# Altium PCB sheet4.PcbDoc (part 2 of 3)
Units mm, origin at the board's own origin, x right, y up, seen from the top; angles counter-clockwise.
Board outline 48.25 x 36 mm, 2 copper layers (Top Layer, Bottom Layer); 112 components, 103 nets, 475 pads, 0 vias.
Unrouted connection lines stored in the file: 312.
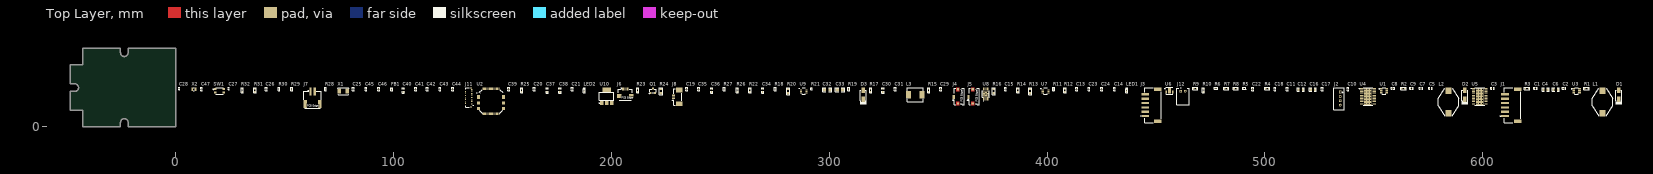
[diagram p0: Top Layer view]

## Part data (continued)
J12: "Conn Shrouded Header (4 Sides) HDR 2 POS 2mm Solder RA Side Entry Thru-Hole Box", Color=Natural,White, Contact Resistance=20mR, Current Rating=2A, Flammability Rating="UL94 V-0", Housing Color=White, Insulation Resistance=1GR, LCSC Part Number=C173752, Manufacturer=JST, Max Operating Temperature=85°C, Max Voltage Rating (AC)=100V, Min Operating Temperature=-25°C, Supplier Part Number 1=8201494P, Category="Headers and Wire Housings", ComponentLink1Description=https://datasheet.ciiva.com/11747/0900766b8082f558-11747128.pdf?src-supplier=Rs, ComponentLink1URL=https://datasheet.ciiva.com/11747/0900766b8082f558-11747128.pdf?src-supplier=Rs, ComponentLink2Description=https://datasheet.ciiva.com/712/eph-712447.pdf?src-supplier=Digi-Key, ComponentLink2URL=https://datasheet.ciiva.com/712/eph-712447.pdf?src-supplier=Digi-Key, ComponentLink3Description=https://datasheet.ciiva.com/16484/s2b-ph-k-slfsn-16484405.pdf?src-supplier=Future+Electronics, ComponentLink3URL=https://datasheet.ciiva.com/16484/s2b-ph-k-slfsn-16484405.pdf?src-supplier=Future+Electronics, ComponentLink4Description=https://datasheet.ciiva.com/26894/getdatasheetpartid-641020-26894599.pdf?src-supplier=Verical, ComponentLink4URL=https://datasheet.ciiva.com/26894/getdatasheetpartid-641020-26894599.pdf?src-supplier=Verical, ComponentLink5Description=https://datasheet.ciiva.com/8052/80564-8052207.pdf?src-supplier=Element14, ComponentLink5URL=https://datasheet.ciiva.com/8052/80564-8052207.pdf?src-supplier=Element14, Contact Material=Brass,Tin,Bronze, Contact Mating Length=0.13inch, Contact Plating=Tin,Copper, Contact Type="Male Pin", Depth=7.6mm, Fastening Type=Detent, Gender=Male, Height=9.4mm, Housing Material=Polyamide, Item Type="JST Connector", Lead Free="Lead Free", Lead Pitch=2mm, Length=5.9mm, Manufacturer Part Number=S2B-PH-K-S(LF)(SN), Max Current Rating=2A, Max Voltage Rating (DC)=100V, Mounting Technology="Through Hole", Number Of Contacts=2, Number of Poles=2, Number of Positions=2, Number of Rows=1, Orientation="Right Angle", Packaging=Bulk, Pins=2, Pitch=2mm, Pricing 1="125=0.02920, 250=0.13800, 1250=0.12800, 5000=0.12200 (GBP)", Reach SVHC Compliant=No, RoHS=Yes, Series=PH, Stock 1=39975, Supplier 1=Rs, Termination=Solder, Voltage Rating=100V, Voltage Rating (AC)=100V, Width=4.5mm, Working Voltage=100V
L1 L2: library part SSL0804T-220M-N, "2.6A 22uH ±20% 0.085Ω 2.6A SMD,12.95x9.4x5.21mm Power Inductors ROHS", LCSC Part Number=C108312, Manufacturer="Chilisin Elec", Package=SMD,12.95x9.4x5.21mm, ComponentLink1Description=LCSC, ComponentLink1URL=https://www.lcsc.com/product-detail/Power-Inductors_Chilisin-Elec-SSL0804T-220M-N_C108312.html, Item Type=Inductor, Manufacturer Part Number=SSL0804T-220M-N
L3: library part 0630CDMCCDS-6R8MC, "FIXED IND 6.8UH 5A 48 MOHM SMD", Case/Package=Nonstandard, Current Rating=5A, DC Resistance (DCR)=48mR, LCSC Part Number=C167295, Manufacturer=Sumida, Max Operating Temperature=125°C, Min Operating Temperature=-55°C, Saturation Current=6.3A, Supplier Part Number 1=308-2467-1-ND, Test Frequency=100kHz, Tolerance=20%, ComponentLink1Description=http://products.sumida.com/products/pdf/0630CDMCDDS.pdf?src-supplier=Digi-Key, ComponentLink1URL=http://products.sumida.com/products/pdf/0630CDMCDDS.pdf?src-supplier=Digi-Key, Core Material=Metal, Height - Seated (Max)=0.118inch, Inductance=6.8uH, Item Type=Inductor, Length=0.276inch, Manufacturer Part Number=0630CDMCCDS-6R8MC, Mount="Surface Mount", Packaging="Tape and Reel", Pricing 1="1=0.97, 10=0.845, 25=0.7848, 50=0.6642, 100=0.6038, 250=0.56752, 500=0.50716 (USD)", RoHS Compliant=Yes, Shielding=Shielded, Stock 1=1582, Supplier 1=Digi-Key, Width=0.26inch
LED1: library part 16-213/GHC-YR1S1/3T, "Green 520~535nm 0402 Light Emitting Diodes (LED) RoHS", LCSC Part Number=C74338, Manufacturer="Everlight Elec", Package=0402, ComponentLink1Description=LCSC, ComponentLink1URL=https://www.lcsc.com/product-detail/Light-Emitting-Diodes-LED_Everlight-Elec-16-213-GHC-YR1S1-3T_C74338.html, Dominant Wavelength / Coordinate rank=520~535nm, Illumination Color=Green, Item Type=LED, Luminous Intensity (IF=20mA)=112~285mcd, Manufacturer Part Number=16-213/GHC-YR1S1/3T, Mounting Type="Surface Mount"
LED2: library part XZMDK68W-2, "LED RED CLEAR CHIP SMD", Case Code (Imperial)=0402, Case Code (Metric)=1005, Forward Voltage=1.95V, Lens Color=Colorless, Manufacturer=SunLED, Supplier Part Number 1=1497-1174-6-ND, Test Current=20mA, Case/Package=0402, Color=Red, ComponentLink1Description=http://www.sunledusa.com/products/spec/XZMDK68W-2.pdf?src-supplier=Digi-Key, ComponentLink1URL=http://www.sunledusa.com/products/spec/XZMDK68W-2.pdf?src-supplier=Digi-Key, ComponentLink2Description=https://www.sunledusa.com/products/spec/XZMDK68W-2.pdf?src-supplier=Digi-Key, ComponentLink2URL=https://www.sunledusa.com/products/spec/XZMDK68W-2.pdf?src-supplier=Digi-Key, Dominant Wavelength=630nm, Height=0.6mm, Item Type=LED, Length=1mm, Lens Transparency=Clear, Luminous Intensity=69mcd, Manufacturer Part Number=XZMDK68W-2, Mount="Surface Mount", Packaging="Tape and Reel", Pricing 1="1=0.43, 10=0.306, 100=0.136, 500=0.0952, 1000=0.0782 (USD)", Stock 1=69539, Supplier 1=Digi-Key, Viewing Angle=120°, Width=0.5mm
Q1: "TRANS NPN 40V 2A SOT23-3", Case/Package=SOT-23-3, Clock Frequency=100MHz, Collector Base Voltage (VCBO)=40V, Collector Emitter Saturation Voltage=115mV, Emitter Base Voltage (VEBO)=6V, Frequency=150MHz, LCSC Part Number=C145175, Manufacturer="ON Semiconductor", Max Collector Current=2A, Max Operating Temperature=150°C, Max Power Dissipation=540mW, Min Operating Temperature=-55°C, Package Quantity=3000, Supplier Part Number 1=6030674, Category=BJTs, Collector Emitter Breakdown Voltage=40V, Collector Emitter Voltage (VCEO)=40V, Collector-emitter Voltage-Max=115mV, ComponentLink1Description=https://datasheet.ciiva.com/976/nss40201l-d-976800.pdf?src-supplier=Digi-Key, ComponentLink1URL=https://datasheet.ciiva.com/976/nss40201l-d-976800.pdf?src-supplier=Digi-Key, ComponentLink2Description=https://datasheet.ciiva.com/11204/nss40201l-d-11204882.pdf?src-supplier=Avnet, ComponentLink2URL=https://datasheet.ciiva.com/11204/nss40201l-d-11204882.pdf?src-supplier=Avnet, ComponentLink3Description=https://datasheet.ciiva.com/16291/nss40201l-d-115376-16291797.pdf?src-supplier=Mouser, ComponentLink3URL=https://datasheet.ciiva.com/16291/nss40201l-d-115376-16291797.pdf?src-supplier=Mouser, ComponentLink4Description=https://datasheet.ciiva.com/30480/0900766b8121b5a5-30480502.pdf?src-supplier=Rs, ComponentLink4URL=https://datasheet.ciiva.com/30480/0900766b8121b5a5-30480502.pdf?src-supplier=Rs, ComponentLink5Description=https://datasheet.ciiva.com/976/nss40201l-d-976801.pdf?src-supplier=Digi-Key, ComponentLink5URL=https://datasheet.ciiva.com/976/nss40201l-d-976801.pdf?src-supplier=Digi-Key, ComponentLink6Description=https://datasheet.ciiva.com/976/nss40201l-d-976802.pdf?src-supplier=Digi-Key, ComponentLink6URL=https://datasheet.ciiva.com/976/nss40201l-d-976802.pdf?src-supplier=Digi-Key, ComponentLink7Description=https://datasheet.ciiva.com/22641/nss40201l-d-22641179.pdf?src-supplier=Farnell, ComponentLink7URL=https://datasheet.ciiva.com/22641/nss40201l-d-22641179.pdf?src-supplier=Farnell, ComponentLink8Description=https://datasheet.ciiva.com/16222/nss40201l-d-16222093.pdf?src-supplier=Future+Electronics, ComponentLink8URL=https://datasheet.ciiva.com/16222/nss40201l-d-16222093.pdf?src-supplier=Future+Electronics, Element Configuration=Single, Gain Bandwidth Product=150MHz, Halogen Free="Halogen Free", Height=1.11mm, hFE Min=200, Item Type=Transistor, Lead Free="Lead Free", Length=3.04mm, Manufacturer Part Number=NSS40201LT1G, Max Breakdown Voltage=40V, Number of Elements=1, Packaging="Tape and Reel", Pins=3, Polarity=NPN, Power Dissipation=540mW, Pricing 1="1=0.42000, 15=0.34000, 75=0.29500, 300=0.25500, 1500=0.21000 (USD)", Radiation Hardening=No, Reach SVHC Compliant=Yes, RoHS=Yes, RoHS Compliant=Yes, Series=-, Stock 1=155, Supplier 1="Future Electronics", Transition Frequency=150MHz, Width=2.64mm
R1 R2: library part RC0603JR-07100KL, "RES 100K OHM 5% 1/10W 0603", Case Code (Imperial)=0603, Case Code (Metric)=1608, LCSC Part Number=C100048, Manufacturer=Yageo, Max Operating Temperature=155°C, Max Power Dissipation=100mW, Min Operating Temperature=-55°C, Resistance=100kR, Resistance Tolerance=5%, Resistor Type="Thick Film", Supplier Part Number 1=311-100KGRCT-ND, Temperature Coefficient=100ppm/°C, Voltage Rating=50V, Case/Package=0603, Category="Chip SMD Resistors", ComponentLink1Description=https://datasheet.ciiva.com/7746/443971-7746424.pdf?src-supplier=Element14, ComponentLink1URL=https://datasheet.ciiva.com/7746/443971-7746424.pdf?src-supplier=Element14, ComponentLink2Description=https://datasheet.ciiva.com/7983/443971-7983686.pdf?src-supplier=Element14, ComponentLink2URL=https://datasheet.ciiva.com/7983/443971-7983686.pdf?src-supplier=Element14, ComponentLink3Description=https://datasheet.ciiva.com/7746/443971-7746423.pdf?src-supplier=Element14, ComponentLink3URL=https://datasheet.ciiva.com/7746/443971-7746423.pdf?src-supplier=Element14, ComponentLink4Description=https://datasheet.ciiva.com/8887/pyu-rc0603-51-rohs-l-4-8887903.pdf?src-supplier=Avnet, ComponentLink4URL=https://datasheet.ciiva.com/8887/pyu-rc0603-51-rohs-l-4-8887903.pdf?src-supplier=Avnet, Contact Plating=Tin,Matte, Features="Moisture Resistant", Item Type=Resistor, Lead Free="Lead Free", Manufacturer Part Number=RC0603JR-07100KL, Number of Pins=2, Number of Terminations=2, Packaging="Tape and Reel", Power Rating=100mW, Pricing 1="1=0.10000, 10=0.02000, 100=0.00800, 1000=0.00360, 2500=0.00312 (USD)", Radiation Hardening=No, REACH SVHC="No SVHC", RoHS=Yes, RoHS Compliant=Yes, Series=RC, Size Code=0603, Stock 1=1210037, Supplier 1=Digi-Key, Termination=SMD/SMT, Tolerance=5%, Voltage Rating (DC)=50V, Width=0.8mm
R3 R4: library part RC0603FR-075K1L, "RES 5.1K OHM 1% 1/10W 0603", Case Code (Imperial)=0603, Case Code (Metric)=1608, LCSC Part Number=C105580, Manufacturer=Yageo, Max Operating Temperature=155°C, Max Power Dissipation=100mW, Min Operating Temperature=-55°C, Package Quantity=1, Resistance=5.1kR, Resistance Tolerance=1%, Resistor Type="Thick Film", Temperature Coefficient=100ppm/°C, Voltage Rating=50V, Case/Package=0603, Category="Chip SMD Resistors", ComponentLink1Description=https://datasheet.ciiva.com/46395/443971-46395016.pdf?src-supplier=Element14, ComponentLink1URL=https://datasheet.ciiva.com/46395/443971-46395016.pdf?src-supplier=Element14, ComponentLink2Description=https://datasheet.ciiva.com/2454/pyu-r-int-thick-7-2454046.pdf?src-supplier=Digi-Key, ComponentLink2URL=https://datasheet.ciiva.com/2454/pyu-r-int-thick-7-2454046.pdf?src-supplier=Digi-Key, ComponentLink3Description=https://datasheet.ciiva.com/2454/pyu-r-int-thick-7-2454047.pdf?src-supplier=Digi-Key, ComponentLink3URL=https://datasheet.ciiva.com/2454/pyu-r-int-thick-7-2454047.pdf?src-supplier=Digi-Key, ComponentLink4Description=https://datasheet.ciiva.com/2454/pyu-r-int-thick-7-2454045.pdf?src-supplier=Digi-Key, ComponentLink4URL=https://datasheet.ciiva.com/2454/pyu-r-int-thick-7-2454045.pdf?src-supplier=Digi-Key, ComponentLink5Description=https://datasheet.ciiva.com/15189/getdatasheetpartid-326732-15189786.pdf?src-supplier=Verical, ComponentLink5URL=https://datasheet.ciiva.com/15189/getdatasheetpartid-326732-15189786.pdf?src-supplier=Verical, Construction=Rectangular, Depth=0.8mm, Features="Moisture Resistant", Height=0.022inch, Item Type=Resistor, Lead Free="Lead Free", Length=0.063inch, Manufacturer Part Number=RC0603FR-075K1L, Military Standard=Not, Number of Pins=2, Number of Terminations=2, Packaging="Tape and Reel", Power Rating=100mW, Pricing 1="5000=0.00133, 10000=0.00131, 20000=0.00127 (USD)", Reach SVHC Compliant=Yes, RoHS=Yes, RoHS Compliant=Yes, Series=RC, Size Code=0603, Stock 1=100000, Supplier 1=Avnet, Supplier Part Number 1=RC0603FR-075K1L, Termination=SMD/SMT, Tolerance=1%, Voltage Rating (DC)=50V, Width=0.031inch
R5 R6 R27 R29 R30: library part RC0402FR-0710KL, "RES 10K OHM 1% 1/16W 0402", Case Code (Imperial)=0402, Case Code (Metric)=1005, LCSC Part Number=C60490, Manufacturer=Yageo, Max Operating Temperature=155°C, Max Power Dissipation=63mW, Min Operating Temperature=-55°C, Power Rating=62.5mW, Resistance=10kR, Resistance Tolerance=1%, Resistor Type="Thick Film", Supplier Part Number 1=603-RC0402FR-0710KL, Temperature Coefficient=100ppm/°C, Voltage Rating=50V, Case/Package=0402, Category="Chip SMD Resistors", ComponentLink1Description=https://datasheet.ciiva.com/7660/38568-7660787.pdf?src-supplier=Element14, ComponentLink1URL=https://datasheet.ciiva.com/7660/38568-7660787.pdf?src-supplier=Element14, ComponentLink2Description=https://datasheet.ciiva.com/7849/1686128-7849814.pdf?src-supplier=Element14, ComponentLink2URL=https://datasheet.ciiva.com/7849/1686128-7849814.pdf?src-supplier=Element14, ComponentLink3Description=https://datasheet.ciiva.com/7983/1018594-7983486.pdf?src-supplier=Element14, ComponentLink3URL=https://datasheet.ciiva.com/7983/1018594-7983486.pdf?src-supplier=Element14, ComponentLink4Description=https://datasheet.ciiva.com/22747/1018594-22747512.pdf?src-supplier=Element14, ComponentLink4URL=https://datasheet.ciiva.com/22747/1018594-22747512.pdf?src-supplier=Element14, ComponentLink5Description=https://datasheet.ciiva.com/12667/pyu-rc0402-51-rohs-l-6-r-12667067.pdf?src-supplier=Mouser, ComponentLink5URL=https://datasheet.ciiva.com/12667/pyu-rc0402-51-rohs-l-6-r-12667067.pdf?src-supplier=Mouser, ComponentLink6Description=https://datasheet.ciiva.com/7849/1784430-7849813.pdf?src-supplier=Element14, ComponentLink6URL=https://datasheet.ciiva.com/7849/1784430-7849813.pdf?src-supplier=Element14, ComponentLink7Description=https://datasheet.ciiva.com/7849/1784430-7849815.pdf?src-supplier=Element14, ComponentLink7URL=https://datasheet.ciiva.com/7849/1784430-7849815.pdf?src-supplier=Element14, Construction=Rectangular, Depth=0.5mm, Features="Moisture Resistant", Height=0.32mm, Lead Free="Lead Free", Lead Pitch=0.2mm, Length=1mm, Manufacturer Part Number=RC0402FR-0710KL, Military Standard=Not, Number of Pins=2, Number of Terminations=2, Packaging="Tape and Reel", Pricing 1="1=0.10000, 10=0.01400, 50=0.01400, 100=0.00500, 1000=0.00300, 10000=0.00200 (USD)", REACH SVHC="No SVHC", RoHS=Yes, RoHS Compliant=Yes, Series=RC, Stock 1=18648329, Supplier 1=Mouser, Termination=SMD/SMT, Tolerance=1%, Voltage Rating (DC)=50V, Width=0.5mm, Working Voltage=50V
R7 R8 R9 R10: library part ERJ-3EKF1501V, "RES SMD 1.5K OHM 1% 1/10W 0603", Case Code (Imperial)=0603, Case Code (Metric)=1608, Manufacturer=Panasonic, Max Operating Temperature=155°C, Max Power Dissipation=100mW, Min Operating Temperature=-55°C, Package Quantity=1, Resistance Tolerance=1%, Resistor Type="Thick Film", Supplier Part Number 1=1755744, Temperature Coefficient=100ppm/°C, Voltage Rating=75V, Case/Package=0603, Category="Chip SMD Resistors", ComponentLink1Description=https://datasheet.ciiva.com/34303/1987644-34303574.pdf?src-supplier=Jameco, ComponentLink1URL=https://datasheet.ciiva.com/34303/1987644-34303574.pdf?src-supplier=Jameco, ComponentLink2Description=https://datasheet.ciiva.com/7830/aoa0000ce2-7830731.pdf?src-supplier=Element14, ComponentLink2URL=https://datasheet.ciiva.com/7830/aoa0000ce2-7830731.pdf?src-supplier=Element14, ComponentLink3Description=https://datasheet.ciiva.com/7830/426256-7830981.pdf?src-supplier=Element14, ComponentLink3URL=https://datasheet.ciiva.com/7830/426256-7830981.pdf?src-supplier=Element14, ComponentLink4Description=https://datasheet.ciiva.com/28514/1678782-28514202.pdf?src-supplier=Element14, ComponentLink4URL=https://datasheet.ciiva.com/28514/1678782-28514202.pdf?src-supplier=Element14, ComponentLink5Description=https://datasheet.ciiva.com/24124/aoa0000ce2-24124271.pdf?src-supplier=Mouser, ComponentLink5URL=https://datasheet.ciiva.com/24124/aoa0000ce2-24124271.pdf?src-supplier=Mouser, ComponentLink6Description=https://datasheet.ciiva.com/16767/70260748-16767326.pdf?src-supplier=Allied+Electronics, ComponentLink6URL=https://datasheet.ciiva.com/16767/70260748-16767326.pdf?src-supplier=Allied+Electronics, ComponentLink7Description=https://datasheet.ciiva.com/16759/70260748-16759967.pdf?src-supplier=Allied+Electronics, ComponentLink7URL=https://datasheet.ciiva.com/16759/70260748-16759967.pdf?src-supplier=Allied+Electronics, ComponentLink8Description=https://datasheet.ciiva.com/9198/aoa0000ce2-9198086.pdf?src-supplier=Avnet, ComponentLink8URL=https://datasheet.ciiva.com/9198/aoa0000ce2-9198086.pdf?src-supplier=Avnet, ComponentLink9Description=https://datasheet.ciiva.com/16449/aoa0000ce2-16449406.pdf?src-supplier=Future+Electronics, ComponentLink9URL=https://datasheet.ciiva.com/16449/aoa0000ce2-16449406.pdf?src-supplier=Future+Electronics, ComponentLink10Description=https://datasheet.ciiva.com/48530/aoa0000ce2-48530982.pdf?src-supplier=Avnet, ComponentLink10URL=https://datasheet.ciiva.com/48530/aoa0000ce2-48530982.pdf?src-supplier=Avnet, Construction=Rectangular, Contact Plating=Tin, Depth=0.8mm, Features="Automotive AEC-Q200", Height=0.45mm, Item Type=Resistor, Lead Free="Lead Free", Length=1.6mm, Manufacturer Part Number=ERJ-3EKF1501V, Military Standard=Not, Mounting Technology="Surface Mount", Number of Terminations=2, Packaging="Tape and Reel", Pins=2, Power Rating=100mW, Pricing 1="5000=0.00000 (GBP)", Radiation Hardening=No, Reach SVHC Compliant=Yes, RoHS=Yes, RoHS Compliant=Yes, Series=ERJ, Stock 1=176974, Supplier 1=Rs, Technology="THICK FILM", Termination=SMD/SMT, Tolerance=1%, Voltage Rating (DC)=75V, Weight=7.1E-05oz, Width=0.8mm
R11: library part CRCW04021K00FKEDHP, "RES SMD 1K OHM 1% 1/5W 0402", Case Code (Imperial)=0402, Case Code (Metric)=1005, LCSC Part Number=C313354, Manufacturer="Vishay Dale", Max Operating Temperature=155°C, Max Power Dissipation=125mW, Min Operating Temperature=-55°C, Package Quantity=10, Resistance=1kR, Resistance Tolerance=1%, Resistor Type="Thick Film", Supplier Part Number 1=541-1.00KYCT-ND, Temperature Coefficient=100ppm/°C, Voltage Rating=50V, Case/Package=0402, ComponentLink1Description=http://www.farnell.com/datasheets/2339608.pdf?src-supplier=Element14, ComponentLink1URL=http://www.farnell.com/datasheets/2339608.pdf?src-supplier=Element14, ComponentLink2Description=http://www.vishay.com/docs/20043/crcwhpe3.pdf?src-supplier=Digi-Key, ComponentLink2URL=http://www.vishay.com/docs/20043/crcwhpe3.pdf?src-supplier=Digi-Key, ComponentLink3Description=http://www.mouser.com/ds/2/427/crcwhpe3-46056.pdf?src-supplier=Mouser, ComponentLink3URL=http://www.mouser.com/ds/2/427/crcwhpe3-46056.pdf?src-supplier=Mouser, ComponentLink4Description=http://www.vishay.com/docs/20043/crcwhpe3.pdf?src-supplier=Avnet, ComponentLink4URL=http://www.vishay.com/docs/20043/crcwhpe3.pdf?src-supplier=Avnet, ComponentLink5Description=http://www.vishay.com/docs/20043/crcwhpe3.pdf?src-supplier=Future+Electronics, ComponentLink5URL=http://www.vishay.com/docs/20043/crcwhpe3.pdf?src-supplier=Future+Electronics, Construction=Rectangular, Contact Plating=Tin, Depth=0.5mm, Features="Automotive AEC-Q200", Height=0.3mm, Lead Free="Lead Free", Length=1mm, Manufacturer Part Number=CRCW04021K00FKEDHP, Military Standard=Not, Mount="Surface Mount", Number of Pins=2, Number of Terminations=2, Packaging="Tape and Reel", Power Rating=125mW, Pricing 1="1=0.15, 10=0.132, 100=0.0506, 1000=0.02226, 2500=0.01923, 5000=0.0172 (USD)", Radiation Hardening=No, REACH SVHC=Unknown, RoHS Compliant=Yes, Series=CRCW-HP, Size Code=0402, Stock 1=315989, Supplier 1=Digi-Key, Technology="THICK FILM", Termination=SMD/SMT, Tolerance=1%, Voltage Rating (DC)=50V, Weight=2.3E-05oz, Width=0.5mm
R12: library part CRCW06036K20JNEA, "RES SMD 6.2K OHM 5% 1/10W 0603", Case Code (Imperial)=0603, Case Code (Metric)=1608, LCSC Part Number=C2079587, Manufacturer="Vishay Dale", Max Operating Temperature=155°C, Max Power Dissipation=100mW, Min Operating Temperature=-55°C, Package Quantity=1, Resistor Type="Thick Film", Temperature Coefficient=200ppm/°C, Tolerance=5%, Voltage Rating=75V, Case/Package=0603, Category="Chip SMD Resistors", ComponentLink1Description=https://datasheet.ciiva.com/3257/dcrcwe3-3257845.pdf?src-supplier=Avnet, ComponentLink1URL=https://datasheet.ciiva.com/3257/dcrcwe3-3257845.pdf?src-supplier=Avnet, ComponentLink2Description=https://datasheet.ciiva.com/2462/dcrcwe3-2462295.pdf?src-supplier=Digi-Key, ComponentLink2URL=https://datasheet.ciiva.com/2462/dcrcwe3-2462295.pdf?src-supplier=Digi-Key, ComponentLink3Description=https://datasheet.ciiva.com/2462/dcrcwe3-2462296.pdf?src-supplier=Digi-Key, ComponentLink3URL=https://datasheet.ciiva.com/2462/dcrcwe3-2462296.pdf?src-supplier=Digi-Key, ComponentLink4Description=https://datasheet.ciiva.com/2462/dcrcwe3-2462297.pdf?src-supplier=Digi-Key, ComponentLink4URL=https://datasheet.ciiva.com/2462/dcrcwe3-2462297.pdf?src-supplier=Digi-Key, ComponentLink5Description=https://datasheet.ciiva.com/5549/dcrcwe3-109170-5549114.pdf?src-supplier=Mouser, ComponentLink5URL=https://datasheet.ciiva.com/5549/dcrcwe3-109170-5549114.pdf?src-supplier=Mouser, Construction=Rectangular, Contact Plating=Tin, Depth=0.85mm, Features="Automotive AEC-Q200", Height=0.02inch, Item Type=Resistor, Lead Free="Lead Free", Length=1.55mm, Manufacturer Part Number=CRCW06036K20JNEA, Military Standard=Not, Number of Terminations=2, Packaging="Tape and Reel", Power Rating=100mW, Pricing 1="1=0.06100, 10=0.02470, 25=0.02440, 50=0.02420, 100=0.01220, 250=0.01170, 500=0.01070, 1000=0.00550 (USD)", Radiation Hardening=No, RoHS=Yes, RoHS Compliant=Yes, Series=CRCW, Stock 1=2763, Supplier 1="Arrow Electronics", Supplier Part Number 1=CRCW06036K20JNEA, Termination=SMD/SMT, Voltage Rating (DC)=75V, Weight=7.1E-05oz, Width=0.033inch
R13 R16 R20 R24: library part TNPW080510R0FEEA, "RES 10 OHM 1% 1/8W 0805", Case Code (Imperial)=0805, Case Code (Metric)=2012, LCSC Part Number=C844061, Manufacturer=Vishay, Max Operating Temperature=125°C, Min Operating Temperature=-55°C, Power Rating=125mW, Resistor Type="Thin Film", Supplier Part Number 1=71-TNPW080510R0FEEA, Temperature Coefficient=25ppm/°C, Tolerance=1%, Voltage Rating=150V, Case/Package=0805, Category="Chip SMD Resistors", ComponentLink1Description=https://datasheet.ciiva.com/16787/70201627-16787918.pdf?src-supplier=Allied+Electronics, ComponentLink1URL=https://datasheet.ciiva.com/16787/70201627-16787918.pdf?src-supplier=Allied+Electronics, Contact Plating=Tin, Depth=1.25mm, Height=0.45mm, Item Type=Resistor, Lead Free="Lead Free", Length=2mm, Manufacturer Part Number=TNPW080510R0FEEA, Mounting Technology="Surface Mount", Packaging="Tape and Reel", Pricing 1="1=0.57000, 10=0.43800, 50=0.43800, 100=0.18500, 500=0.13400, 1000=0.10200, 2500=0.09600, 5000=0.08500, 10000=0.08500 (USD)", Radiation Hardening=No, RoHS=Yes, RoHS Compliant=Yes, Series="TNPW e3", Stock 1=22670, Supplier 1=Mouser, Technology="THIN FILM", Termination=SMD/SMT, Weight=0.000194oz, Width=1.2mm
R14 R22: library part RL0603FR-070R1L, "RES 0.1 OHM 1% 1/10W 0603", Case Code (Imperial)=0603, Case Code (Metric)=1608, LCSC Part Number=C326946, Manufacturer=Yageo, Max Operating Temperature=125°C, Max Power Dissipation=100mW, Min Operating Temperature=-55°C, Package Quantity=1, Resistance Tolerance=1%, Resistor Type="Thick Film", Supplier Part Number 1=1378876, Temperature Coefficient=800ppm/°C, Voltage Rating=50V, Case/Package=0603, Category="Chip SMD Resistors", ComponentLink1Description=https://datasheet.ciiva.com/15328/pyu-rl-521-rohs-l-5-15328748.pdf?src-supplier=Mouser, ComponentLink1URL=https://datasheet.ciiva.com/15328/pyu-rl-521-rohs-l-5-15328748.pdf?src-supplier=Mouser, ComponentLink2Description=https://datasheet.ciiva.com/7746/877049-7746575.pdf?src-supplier=Element14, ComponentLink2URL=https://datasheet.ciiva.com/7746/877049-7746575.pdf?src-supplier=Element14, Construction=Rectangular, Contact Plating=Tin,Matte, Depth=0.8mm, Features="Moisture Resistant", Height=0.022inch, Item Type=Resistor, Lead Free="Lead Free", Lead Pitch=0.25mm, Length=0.063inch, Manufacturer Part Number=RL0603FR-070R1L, Military Standard=Not, Number of Terminations=2, Packaging="Tape and Reel", Pins=2, Power Rating=100mW, Pricing 1="5000=0.02140, 15000=0.02080, 20000=0.02050, 50000=0.02000, 75000=0.01970, 100000=0.01960, 150000=0.01930, 200000=0.01880, 375000=0.01840 (USD)", Radiation Hardening=No, RoHS=Yes, RoHS Compliant=Yes, Series=RL, Stock 1=530000, Supplier 1="Future Electronics", Technology="THICK FILM", Termination=SMD/SMT, Tolerance=1%, Voltage Rating (DC)=50V, Weight=7.1E-05oz, Width=0.8mm
R15: library part RC0603FR-07200KL, "RES SMD 200K OHM 1% 1/10W 0603", LCSC Part Number=C105574, Manufacturer=Yageo, Package=0603, ComponentLink3Description=LCSC, ComponentLink3URL=https://www.lcsc.com/product-detail/Chip-Resistor-Surface-Mount_YAGEO-RC0603FR-07200KL_C105574.html, Item Type=Resistor, Manufacturer Part Number=RC0603FR-07200KL
R17: library part RT0603BRD0768KL, "RES SMD 68K OHM 0.1% 1/10W 0603", Case Code (Imperial)=0603, Case Code (Metric)=1608, Manufacturer=Yageo, Max Operating Temperature=125°C, Min Operating Temperature=-55°C, Power Rating=100mW, Resistance=68kR, Resistor Type="Thin Film", Supplier Part Number 1=YAG4586CT-ND, Temperature Coefficient=25ppm/°C, Tolerance=0.1%, Voltage Rating=75V, Voltage Rating (DC)=50V, Case/Package=0603, Category="Chip SMD Resistors", ComponentLink1Description=https://datasheet.ciiva.com/12694/pyu-rt-1-to-0-05-rohs-l-4-12694907.pdf?src-supplier=Mouser, ComponentLink1URL=https://datasheet.ciiva.com/12694/pyu-rt-1-to-0-05-rohs-l-4-12694907.pdf?src-supplier=Mouser, Construction=Rectangular, Contact Plating=Tin,Matte, Depth=0.8mm, Lead Free="Lead Free", Length=1.6mm, Manufacturer Part Number=RT0603BRD0768KL, Military Standard=Not, Packaging="Tape and Reel", Pricing 1="1=0.34000, 10=0.28800, 100=0.11260, 1000=0.04716, 2500=0.04322 (USD)", Radiation Hardening=No, RoHS=Yes, RoHS Compliant=Yes, Series=RT, Stock 1=45000, Supplier 1=Digi-Key, Termination=SMD/SMT, Width=800um
R18: library part ERJ-2RKF47R0X, "RES SMD 47 OHM 1% 1/10W 0402", Case Code (Imperial)=0402, Case Code (Metric)=1005, LCSC Part Number=C413056, Manufacturer=Panasonic, Max Operating Temperature=155°C, Max Power Dissipation=100mW, Min Operating Temperature=-55°C, Package Quantity=1, Resistance Tolerance=1%, Resistor Type="Thick Film", Supplier Part Number 1=64R5286, Temperature Coefficient=100ppm/°C, Voltage Rating=50V, Case/Package=0402, Category="Chip SMD Resistors", ComponentLink1Description=https://datasheet.ciiva.com/11821/0900766b80f80784-11821333.pdf?src-supplier=RSComponents, ComponentLink1URL=https://datasheet.ciiva.com/11821/0900766b80f80784-11821333.pdf?src-supplier=RSComponents, ComponentLink2Description=https://datasheet.ciiva.com/6082/aoa0000ce2-6082054.pdf?src-supplier=Farnell, ComponentLink2URL=https://datasheet.ciiva.com/6082/aoa0000ce2-6082054.pdf?src-supplier=Farnell, ComponentLink3Description=https://datasheet.ciiva.com/7886/aoa0000ce2-7886719.pdf?src-supplier=Element14, ComponentLink3URL=https://datasheet.ciiva.com/7886/aoa0000ce2-7886719.pdf?src-supplier=Element14, ComponentLink4Description=https://datasheet.ciiva.com/7887/426256-7887019.pdf?src-supplier=Element14, ComponentLink4URL=https://datasheet.ciiva.com/7887/426256-7887019.pdf?src-supplier=Element14, ComponentLink5Description=https://datasheet.ciiva.com/43467/1678782-43467189.pdf?src-supplier=Farnell, ComponentLink5URL=https://datasheet.ciiva.com/43467/1678782-43467189.pdf?src-supplier=Farnell, ComponentLink6Description=https://datasheet.ciiva.com/46373/1678782-46373909.pdf?src-supplier=Element14, ComponentLink6URL=https://datasheet.ciiva.com/46373/1678782-46373909.pdf?src-supplier=Element14, ComponentLink7Description=https://datasheet.ciiva.com/22684/1678782-22684775.pdf?src-supplier=Element14, ComponentLink7URL=https://datasheet.ciiva.com/22684/1678782-22684775.pdf?src-supplier=Element14, ComponentLink8Description=https://datasheet.ciiva.com/46373/1678782-46373910.pdf?src-supplier=Element14, ComponentLink8URL=https://datasheet.ciiva.com/46373/1678782-46373910.pdf?src-supplier=Element14, ComponentLink9Description=https://datasheet.ciiva.com/24165/aoa0000ce2-24165246.pdf?src-supplier=Mouser, ComponentLink9URL=https://datasheet.ciiva.com/24165/aoa0000ce2-24165246.pdf?src-supplier=Mouser, ComponentLink10Description=https://datasheet.ciiva.com/16786/70260748-16786359.pdf?src-supplier=Allied+Electronics, ComponentLink10URL=https://datasheet.ciiva.com/16786/70260748-16786359.pdf?src-supplier=Allied+Electronics, ComponentLink11Description=https://datasheet.ciiva.com/16783/70260748-16783259.pdf?src-supplier=Allied+Electronics, ComponentLink11URL=https://datasheet.ciiva.com/16783/70260748-16783259.pdf?src-supplier=Allied+Electronics, ComponentLink12Description=https://datasheet.ciiva.com/9189/aoa0000ce2-9189325.pdf?src-supplier=Avnet, ComponentLink12URL=https://datasheet.ciiva.com/9189/aoa0000ce2-9189325.pdf?src-supplier=Avnet, ComponentLink13Description=https://datasheet.ciiva.com/9189/aoa0000ce2-9189323.pdf?src-supplier=Avnet, ComponentLink13URL=https://datasheet.ciiva.com/9189/aoa0000ce2-9189323.pdf?src-supplier=Avnet, Construction=Rectangular, Contact Plating=Tin, Depth=0.5mm, Features="Automotive AEC-Q200", Height=0.35mm, Item Type=Resistor, Lead Free="Lead Free", Length=1mm, Manufacturer Part Number=ERJ-2RKF47R0X, Military Standard=Not, Mount="Surface Mount", Number of Pins=2, Number of Terminations=2, Packaging="Tape and Reel", Power Rating=100mW, Pricing 1="1=0.08100, 25=0.03700, 100=0.01500, 250=0.01300, 500=0.01000, 1000=0.00700, 2500=0.00500 (USD)", Reach SVHC Compliant=Yes, Resistance=47R, RoHS=Yes, RoHS Compliant=Yes, Series=ERJ, Stock 1=48669, Supplier 1=Avnet, Technology="THICK FILM", Termination=SMD/SMT, Tolerance=1%, Voltage Rating (DC)=50V, Weight=2.8E-05oz, Width=0.5mm
R19: library part RC0402FR-0751KL, "RES 51K OHM 1% 1/16W 0402", Case Code (Imperial)=0402, Case Code (Metric)=1005, LCSC Part Number=C107229, Manufacturer=Yageo, Max Operating Temperature=155°C, Max Power Dissipation=63mW, Min Operating Temperature=-55°C, Package Quantity=1, Resistance Tolerance=1%, Resistor Type="Thick Film", Supplier Part Number 1=6056592, Temperature Coefficient=100ppm/°C, Voltage Rating=50V, Case/Package=0402, Category="Chip SMD Resistors", ComponentLink1Description=https://datasheet.ciiva.com/7850/1018594-7850037.pdf?src-supplier=Element14, ComponentLink1URL=https://datasheet.ciiva.com/7850/1018594-7850037.pdf?src-supplier=Element14, ComponentLink2Description=https://datasheet.ciiva.com/2519/pyu-r-int-thick-7-2519211.pdf?src-supplier=Digi-Key, ComponentLink2URL=https://datasheet.ciiva.com/2519/pyu-r-int-thick-7-2519211.pdf?src-supplier=Digi-Key, ComponentLink3Description=https://datasheet.ciiva.com/2519/pyu-r-int-thick-7-2519212.pdf?src-supplier=Digi-Key, ComponentLink3URL=https://datasheet.ciiva.com/2519/pyu-r-int-thick-7-2519212.pdf?src-supplier=Digi-Key, ComponentLink4Description=https://datasheet.ciiva.com/2519/pyu-r-int-thick-7-2519210.pdf?src-supplier=Digi-Key, ComponentLink4URL=https://datasheet.ciiva.com/2519/pyu-r-int-thick-7-2519210.pdf?src-supplier=Digi-Key, Construction=Rectangular, Depth=0.5mm, Features="Moisture Resistant", Height=0.016inch, Item Type=Resistor, Lead Free="Lead Free", Length=0.039inch, Manufacturer Part Number=RC0402FR-0751KL, Military Standard=Not, Number of Terminations=2, Packaging="Cut Tape", Power Rating=63mW, Pricing 1="10000=0.00100, 50000=0.00100, 300000=0.00090, 1000000=0.00090, 3000000=0.00080 (USD)", RoHS=Yes, RoHS Compliant=Yes, Series=RC, Stock 1=610000, Supplier 1="Future Electronics", Technology="THICK FILM", Termination=SMD/SMT, Tolerance=1%, Voltage Rating (DC)=50V, Width=0.02inch, Working Voltage=50V
R21: library part RC0201FR-0723K7L, "RES 23.7K OHM 1% 1/20W 0201", Case Code (Imperial)=0201, Case Code (Metric)=0603, LCSC Part Number=C474614, Manufacturer=Yageo, Max Operating Temperature=125°C, Max Power Dissipation=50mW, Min Operating Temperature=-55°C, Temperature Coefficient=200ppm/°C, Tolerance=1%, Case/Package=0201, Category="Chip SMD Resistors", ComponentLink1Description=http://www.yageo.com/documents/recent/PYu-RC_Group_51_RoHS_L_9.pdf?src-supplier=Digi-Key, ComponentLink1URL=http://www.yageo.com/documents/recent/PYu-RC_Group_51_RoHS_L_9.pdf?src-supplier=Digi-Key, Features="Moisture Resistant", Item Type=Resistor, Lead Free="Lead Free", Manufacturer Part Number=RC0201FR-0723K7L, Number of Terminations=2, Packaging="Cut Tape", Pricing 1="1=0.09400, 10=0.01600, 25=0.01580, 100=0.00660, 250=0.00650, 1000=0.00380, 3000=0.00280 (USD)", RoHS=Yes, RoHS Compliant=Yes, Series=RC, Stock 1=11544, Supplier 1="Arrow Electronics", Supplier Part Number 1=RC0201FR-0723K7L
R23: library part RC0603FR-07100RL, "RES SMD 100 OHM 1% 1/10W 0603", Case Code (Imperial)=0603, Case Code (Metric)=1608, LCSC Part Number=C105588, Manufacturer=Yageo, Max Operating Temperature=155°C, Max Power Dissipation=100mW, Min Operating Temperature=-55°C, Resistance Tolerance=1%, Resistor Type="Thick Film", Temperature Coefficient=100ppm/°C, Voltage Rating=50V, Case/Package=0603, Category="Chip SMD Resistors", Construction=Rectangular, Depth=0.8mm, Features="Moisture Resistant", Height=0.45mm, Lead Free="Lead Free", Length=1.6mm, Manufacturer Part Number=RC0603FR-07100RL, Military Standard=Not, Number of Pins=2, Number of Terminations=2, Packaging="Tape and Reel", Power Rating=100mW, Pricing 1="5000=0.00300, 5000=0.00200, 5000=0.00450, 50000=0.00410, 500000=0.00230, 2500000=0.00140 (USD)", REACH SVHC=Unknown, Resistance=100R, RoHS=Yes, RoHS Compliant=Yes, Series=RC, Size Code=0603, Stock 1=3800000, Supplier 1="Arrow Electronics", Supplier Part Number 1=RC0603FR-07100RL, Technology="THICK FILM", Termination=SMD/SMT, Tolerance=1%, Voltage Rating (DC)=50V, Width=0.8mm
R25: library part ERJ3EKF3300V, "RES SMD 330 OHM 1% 1/10W 0603", Case Code (Imperial)=0603, Case Code (Metric)=1608, Manufacturer=Panasonic, Max Operating Temperature=155°C, Max Power Dissipation=100mW, Min Operating Temperature=-55°C, Package Quantity=5000, Resistance Tolerance=1%, Resistor Type="Thick Film", Supplier Part Number 1=1229278, Temperature Coefficient=100ppm/°C, Voltage Rating=75V, Case/Package=0603, Category="Chip SMD Resistors", ComponentLink1Description=https://datasheet.ciiva.com/7886/aoa0000ce2-7886729.pdf?src-supplier=Element14, ComponentLink1URL=https://datasheet.ciiva.com/7886/aoa0000ce2-7886729.pdf?src-supplier=Element14, ComponentLink2Description=https://datasheet.ciiva.com/46373/1678782-46373899.pdf?src-supplier=Element14, ComponentLink2URL=https://datasheet.ciiva.com/46373/1678782-46373899.pdf?src-supplier=Element14, ComponentLink3Description=https://datasheet.ciiva.com/22721/426256-22721099.pdf?src-supplier=Element14, ComponentLink3URL=https://datasheet.ciiva.com/22721/426256-22721099.pdf?src-supplier=Element14, ComponentLink4Description=https://datasheet.ciiva.com/46373/1678782-46373900.pdf?src-supplier=Element14, ComponentLink4URL=https://datasheet.ciiva.com/46373/1678782-46373900.pdf?src-supplier=Element14, Construction=Rectangular, Contact Plating=Tin, Depth=0.8mm, Features="Automotive AEC-Q200", Height=0.45mm, Item Type=Resistor, Lead Free="Lead Free", Length=1.6mm, Manufacturer Part Number=ERJ3EKF3300V, Military Standard=Not, Mounting Technology="Surface Mount", Number of Terminations=2, Packaging="Tape and Reel", Pins=2, Power Rating=100mW, Pricing 1="5000=0.00000 (GBP)", Radiation Hardening=No, Reach SVHC Compliant=Yes, RoHS=Yes, RoHS Compliant=Yes, Series=ERJ, Stock 1=205000, Supplier 1=Rs, Termination=SMD/SMT, Tolerance=1%, Voltage Rating (DC)=75V, Weight=7.1E-05oz, Width=0.8mm
R26: library part FRC0603F1693TS, "±1% 169kΩ 0603 Chip Resistor - Surface Mount ROHS", LCSC Part=C3013192, Manufacturer=FOJAN, Package=0603, ComponentLink1Description=LCSC, ComponentLink1URL=https://www.lcsc.com/product-detail/span-style-background-color-ff0-Chip-span-span-style-background-color-ff0-Resistor-span-Surface-Mount_FOJAN-FRC0603F1693TS_C3013192.html, Item Type=Resistor, Manufacturer Part Number=FRC0603F1693TS
R28: library part RT0402BRD07806RL, "RES SMD 806 OHM 0.1% 1/16W 0402", Case Code (Imperial)=0402, Case Code (Metric)=1005, LCSC Part Number=C852922, Manufacturer=Yageo, Max Operating Temperature=155°C, Max Power Dissipation=63mW, Min Operating Temperature=-55°C, Package Quantity=10000, Power Rating=62.5mW, Resistor Type="Thin Film", Temperature Coefficient=25ppm/°C, Tolerance=0.1%, Voltage Rating=50V, Case/Package=0402, Category="Chip SMD Resistors", ComponentLink1Description=https://datasheet.ciiva.com/2582/pyu-rt-1-to-0-05-rohs-l-4-2582500.pdf?src-supplier=Digi-Key, ComponentLink1URL=https://datasheet.ciiva.com/2582/pyu-rt-1-to-0-05-rohs-l-4-2582500.pdf?src-supplier=Digi-Key, ComponentLink2Description=https://datasheet.ciiva.com/46635/pyu-rt-1-to-0-05-rohs-l-5-46635068.pdf?src-supplier=Digi-Key, ComponentLink2URL=https://datasheet.ciiva.com/46635/pyu-rt-1-to-0-05-rohs-l-5-46635068.pdf?src-supplier=Digi-Key, Features="Moisture Resistant", Height=0.014inch, Item Type=Resistor, Lead Free="Lead Free", Length=0.039inch, Manufacturer Part Number=RT0402BRD07806RL, Number of Terminations=2, Packaging="Tape and Reel", Pricing 1="1=0.32050, 10=0.28580, 25=0.25690, 100=0.10950 (USD)", Resistance=806R, RoHS=Yes, RoHS Compliant=Yes, Series=RT, Stock 1=104, Supplier 1="Arrow Electronics", Supplier Part Number 1=RT0402BRD07806RL, Termination=SMD/SMT, Voltage Rating (DC)=50V, Width=0.02inch
R31 R32: library part RC0603FR-070RL, "RES SMD 0R, 1%, 0.1W, 0603", LCSC Part Number=C100044, Manufacturer=Yageo, Package=0603, ComponentLink9Description=LCSC, ComponentLink9URL=https://www.lcsc.com/product-detail/Chip-Resistor-Surface-Mount_YAGEO-RC0603FR-070RL_C100044.html, Item Type=Resistor, Manufacturer Part Number=RC0603FR-070RL
SW1: "3mm 2mm Round Button 50mA Top3.65mm SPST 12V SMD Tactile Switches", LCSC Part Number=C318893, Manufacturer=XKB, ComponentLink1Description=LCSC, ComponentLink1URL=https://lcsc.com/product-detail/Tactile-Switches_XKB-Connectivity-TS-1185EC-C-D-B_C318893.html, Manufacturer Part Number=TS-1185EC-C-D-B
U1 U3: "boost converterType 1 Boost 28V 2V~24V 1.2MHz SOT-23-6 DC-DC Converters ROHS", LCSC Part Number=C84817, Manufacturer="XI'AN Aerosemi Tech", Package=SOT-23-6, ComponentLink1Description=LCSC, ComponentLink1URL=https://www.lcsc.com/product-detail/DC-DC-Converters_XI-AN-Aerosemi-Tech-MT3608_C84817.html, Item Type=IC, Manufacturer Part Number=MT3608
U2: "IC MCU 32BIT 256KB FLASH 64LQFP", Case/Package=LQFP, Clock Frequency=72MHz, LCSC Part Number=C8323, Manufacturer=STMicroelectronics, Max Operating Temperature=85°C, Max Supply Voltage=3.6V, Min Operating Temperature=-40°C, Min Supply Voltage=2V, Package Quantity=960, Supplier Part Number 1=511-STM32F103RCT6, Category=Microcontrollers, ComponentLink1Description=https://datasheet.ciiva.com/4845/cd00191185-4845648.pdf?src-supplier=Mouser, ComponentLink1URL=https://datasheet.ciiva.com/4845/cd00191185-4845648.pdf?src-supplier=Mouser, ComponentLink2Description=https://datasheet.ciiva.com/8054/1831497-8054949.pdf?src-supplier=Element14, ComponentLink2URL=https://datasheet.ciiva.com/8054/1831497-8054949.pdf?src-supplier=Element14, ComponentLink3Description=https://datasheet.ciiva.com/5752/cd00191185-5752853.pdf?src-supplier=Farnell, ComponentLink3URL=https://datasheet.ciiva.com/5752/cd00191185-5752853.pdf?src-supplier=Farnell, ComponentLink4Description=https://datasheet.ciiva.com/9224/cd00191185-9224408.pdf?src-supplier=Avnet, ComponentLink4URL=https://datasheet.ciiva.com/9224/cd00191185-9224408.pdf?src-supplier=Avnet, ComponentLink5Description=https://datasheet.ciiva.com/16382/cd00191185-16382444.pdf?src-supplier=Future+Electronics, ComponentLink5URL=https://datasheet.ciiva.com/16382/cd00191185-16382444.pdf?src-supplier=Future+Electronics, Core Architecture=ARM, Data Bus Width=32b, Height=1.4mm, Interface=I2C,SPI,USB,CAN,USART, Item Type=IC, Lead Free="Lead Free", Length=10mm, Manufacturer Part Number=STM32F103RCT6, Memory Format=FLASH, Memory Size=256KB, Number of ADC Channels=16, Number of I/Os=51, Number of Timers/Counters=8, Packaging=Tray, Pins=64, Pricing 1="1=9.74000, 10=8.79000, 50=8.38000, 100=7.28000, 1000=5.58000, 10000=5.58000 (USD)", RAM Size=48KB, RoHS=Yes, RoHS Compliant=Yes, Series=STM32F103RC, Stock 1=44788, Supplier 1=Mouser, Weight=0.012088oz, Width=10mm
U4 U5: "IC MTRDRV UNIPLR 0-5.5V 24HTSSOP", LCSC Part Number=C2150479, Manufacturer="Texas Instruments", Max Operating Temperature=125°C, Min Operating Temperature=-40°C, Output Current=10mA, Supplier Part Number 1=296-50274-1-ND, Category="Motor Drivers", ComponentLink1Description=https://www.ti.com/lit/ds/symlink/drv8873-q1.pdf?src-supplier=Digi-Key, ComponentLink1URL=https://www.ti.com/lit/ds/symlink/drv8873-q1.pdf?src-supplier=Digi-Key, ComponentLink2Description=http://www.ti.com/general/docs/suppproductinfo.tsp?distId=10&amp;gotoUrl=http%3A%2F%2Fwww.ti.com%2Flit%2Fgpn%2Fdrv8873-q1&src-supplier=Digi-Key, ComponentLink2URL=http://www.ti.com/general/docs/suppproductinfo.tsp?distId=10&amp;gotoUrl=http%3A%2F%2Fwww.ti.com%2Flit%2Fgpn%2Fdrv8873-q1&src-supplier=Digi-Key, Interface=SPI, Item Type=IC, Logic Function="AND GATE", Manufacturer Part Number=DRV8873HPWPRQ1, Mounting Technology="Surface Mount", Packaging="Cut Tape", Pricing 1="1=7.02000, 5=6.19800, 10=5.47500, 25=4.44200, 50=3.92540, 100=3.82210, 500=3.20230, 1000=3.09900 (USD)", RoHS=Yes, RoHS Compliant=Yes, Supplier 1=Digi-Key
U6: "IC BATT CONTRL LI-ION 2CEL 10DFN", Battery Pack Voltage=8.4V, Case/Package=DFN, Drain to Source Resistance=350mR, LCSC Part Number=C60668, Manufacturer=Microchip, Max Charge Current=1.1A, Max Operating Temperature=85°C, Max Output Voltage=8.85V, Max Supply Voltage=18V, Min Operating Temperature=-40°C, Min Output Voltage=8.15V, Min Supply Voltage=4.2V, Operating Supply Current=700uA, Package Quantity=120, Supplier Part Number 1=6878660, Category="Battery Management", ComponentLink1Description=https://datasheet.ciiva.com/1137/554364-1137792.pdf?src-supplier=Element14, ComponentLink1URL=https://datasheet.ciiva.com/1137/554364-1137792.pdf?src-supplier=Element14, ComponentLink2Description=https://datasheet.ciiva.com/16453/filehandler-aspxddocname-en544011-16453863.pdf?src-supplier=Future+Electronics, ComponentLink2URL=https://datasheet.ciiva.com/16453/filehandler-aspxddocname-en544011-16453863.pdf?src-supplier=Future+Electronics, ComponentLink3Description=https://datasheet.ciiva.com/1137/22190b-1137793.pdf?src-supplier=Element14, ComponentLink3URL=https://datasheet.ciiva.com/1137/22190b-1137793.pdf?src-supplier=Element14, ComponentLink4Description=https://datasheet.ciiva.com/4873/22190a-13379-4873436.pdf?src-supplier=Mouser, ComponentLink4URL=https://datasheet.ciiva.com/4873/22190a-13379-4873436.pdf?src-supplier=Mouser, ComponentLink5Description=https://datasheet.ciiva.com/3213/22190b-3213399.pdf?src-supplier=Avnet, ComponentLink5URL=https://datasheet.ciiva.com/3213/22190b-3213399.pdf?src-supplier=Avnet, ComponentLink6Description=https://datasheet.ciiva.com/1933/22190b-1933113.pdf?src-supplier=Digi-Key, ComponentLink6URL=https://datasheet.ciiva.com/1933/22190b-1933113.pdf?src-supplier=Digi-Key, Fault Protection="Over Voltage", Height=0.88mm, Item Type=IC, Lead Free="Lead Free", Length=3mm, Manufacturer Part Number=MCP73213-A6SI/MF, Max Output Current=1.1A, Mounting Technology="Surface Mount", Number of Cells=2, Number of Channels=2, Output Voltage=8.4V, Packaging=Rail/Tube, Pins=10, Pricing 1="1=-1.00000, 25=1.85000, 100=1.76000 (GBP)", Radiation Hardening=No, Reach SVHC Compliant=Yes, RoHS=Yes, RoHS Compliant=Yes, Series=-, Stock 1=128, Supplier 1=Rs, Voltage Rating=8.85V, Width=3mm
U7 U9: "IC CURRENT MONITOR 1% SOT23-8", Case/Package=SOT-23-8, Input Offset Voltage (Vos)=100uV, LCSC Part Number=C87469, Manufacturer="Texas Instruments", Max Operating Temperature=125°C, Max Supply Current=5mA, Max Supply Voltage=5.5V, Min Input Voltage=0V, Min Operating Temperature=-40°C, Min Supply Voltage=3V, Nominal Supply Current=700uA, Operating Supply Current=1mA, Output Current=10mA, Package Quantity=3000, Supplier Part Number 1=595-INA219AIDCNR, Accuracy=1%, Bandwidth=3.4MHz, Category="Amplifiers - Op Amps, Buffer, Instrumentation", Common Mode Rejection Ratio=100dB, ComponentLink1Description=https://datasheet.ciiva.com/15132/getdatasheetpartid-327029-15132621.pdf?src-supplier=Verical, ComponentLink1URL=https://datasheet.ciiva.com/15132/getdatasheetpartid-327029-15132621.pdf?src-supplier=Verical, ComponentLink2Description=https://datasheet.ciiva.com/1492/ina219-1492467.pdf?src-supplier=Farnell, ComponentLink2URL=https://datasheet.ciiva.com/1492/ina219-1492467.pdf?src-supplier=Farnell, ComponentLink3Description=https://datasheet.ciiva.com/1484/1725057-1484939.pdf?src-supplier=Element14, ComponentLink3URL=https://datasheet.ciiva.com/1484/1725057-1484939.pdf?src-supplier=Element14, ComponentLink4Description=https://datasheet.ciiva.com/22658/1725057-22658890.pdf?src-supplier=Element14, ComponentLink4URL=https://datasheet.ciiva.com/22658/1725057-22658890.pdf?src-supplier=Element14, ComponentLink5Description=https://datasheet.ciiva.com/1939/ina219-1939574.pdf?src-supplier=Digi-Key, ComponentLink5URL=https://datasheet.ciiva.com/1939/ina219-1939574.pdf?src-supplier=Digi-Key, ComponentLink6Description=https://datasheet.ciiva.com/1939/ina219-1939573.pdf?src-supplier=Digi-Key, ComponentLink6URL=https://datasheet.ciiva.com/1939/ina219-1939573.pdf?src-supplier=Digi-Key, ComponentLink7Description=https://datasheet.ciiva.com/1939/ina219-1939575.pdf?src-supplier=Digi-Key, ComponentLink7URL=https://datasheet.ciiva.com/1939/ina219-1939575.pdf?src-supplier=Digi-Key, ComponentLink8Description=https://datasheet.ciiva.com/2965/ina219-2965724.pdf?src-supplier=Avnet, ComponentLink8URL=https://datasheet.ciiva.com/2965/ina219-2965724.pdf?src-supplier=Avnet, Contact Plating=Gold, Features=I²C, Height=1.3mm, Item Type=IC, Lead Free="Lead Free", Length=3mm, Manufacturer Part Number=INA219AIDCNR, Number of Amplifiers=1, Output Current per Channel=10mA, Output Type=Digital, Packaging="Tape and Reel", Pins=8, Pricing 1="1=2.62000, 10=2.36000, 50=2.23000, 100=1.90000, 1000=1.29000, 10000=1.21000 (USD)", Quiescent Current=700uA, Radiation Hardening=No, Reach SVHC Compliant=Yes, RoHS=Yes, RoHS Compliant=Yes, Series=Zero-Drift, Stock 1=22974, Supplier 1=Mouser, Supply Current=700uA, Weight=0.001411oz, Width=1.75mm
U8: "IC REG BCK SPLIT RAIL ADJ 10MSOP", Case/Package=HVSSOP, LCSC Part Number=C53213, Manufacturer="Texas Instruments", Max Operating Temperature=125°C, Max Output Current=2.5A, Max Output Voltage=39V, Max Supply Voltage=42V, Min Input Voltage=3.5V, Min Operating Temperature=-40°C, Min Output Voltage=800mV, Package Quantity=1, Quiescent Current=138uA, Supplier Part Number 1=296-27414-1-ND, Switching Frequency=2.5MHz, Category="Voltage Regulators - Switching", ComponentLink1Description=https://datasheet.ciiva.com/2026/tps54240-2026016.pdf?src-supplier=Digi-Key, ComponentLink1URL=https://datasheet.ciiva.com/2026/tps54240-2026016.pdf?src-supplier=Digi-Key, ComponentLink2Description=https://datasheet.ciiva.com/41462/001014834-da-01-en-ic-reg-buck-ad-tps54240dgqr-vssop-10-tid-41462681.pdf?src-supplier=Conrad, ComponentLink2URL=https://datasheet.ciiva.com/41462/001014834-da-01-en-ic-reg-buck-ad-tps54240dgqr-vssop-10-tid-41462681.pdf?src-supplier=Conrad, ComponentLink3Description=https://datasheet.ciiva.com/2026/tps54240-2026015.pdf?src-supplier=Digi-Key, ComponentLink3URL=https://datasheet.ciiva.com/2026/tps54240-2026015.pdf?src-supplier=Digi-Key, ComponentLink4Description=https://datasheet.ciiva.com/2026/tps54240-2026014.pdf?src-supplier=Digi-Key, ComponentLink4URL=https://datasheet.ciiva.com/2026/tps54240-2026014.pdf?src-supplier=Digi-Key, ComponentLink5Description=https://datasheet.ciiva.com/14378/slvsaa6-14378059.pdf?src-supplier=Avnet, ComponentLink5URL=https://datasheet.ciiva.com/14378/slvsaa6-14378059.pdf?src-supplier=Avnet, Contact Plating=Gold, Height=0.95mm, Item Type=IC, Lead Free="Lead Free", Length=3.1mm, Manufacturer Part Number=TPS54240DGQR, Min Supply Voltage=3.5V, Number Of Outputs=1, Operating Supply Voltage=42V, Output Current=2.5A, Output Type=Adjustable, Output Voltage=39V, Packaging="Tape and Reel", Pins=10, Pricing 1="1=3.26000, 10=2.93100, 25=2.77120, 100=2.40190, 250=2.27868, 500=2.04466, 1000=1.74300 (USD)", Radiation Hardening=No, Reach SVHC Compliant=Yes, RoHS=Yes, RoHS Compliant=Yes, Series="SWIFT™, Eco-Mode™", Supplier 1=Digi-Key, Synchronous Rectifier=No, Topology=Buck-Boost, Width=3.1mm
U10: "SOT-223 Linear Voltage Regulators (LDO) ROHS", LCSC Part Number=C2992570, Manufacturer="GUOXIN JIAPIN SEMICONDUCTOR", Package=SOT-223, ComponentLink1Description=LCSC, ComponentLink1URL=https://www.lcsc.com/product-detail/Linear-Voltage-Regulators-LDO_GUOXIN-JIAPIN-SEMICONDUCTOR-AMS1117-3-3_C2992570.html, Item Type=IC, Manufacturer Part Number=AMS1117-3.3